# Altium PCB HCD_PCB.PcbDoc (part 3 of 4)
Units mil, origin at the board's own origin, x right, y up, seen from the top; angles counter-clockwise.
Board outline 2762.03 x 3428.03 mil, 2 copper layers (Top Layer, Bottom Layer), stack 57 mil thick; 112 components, 73 nets, 363 pads, 145 vias.
Unrouted connection lines stored in the file: 1.
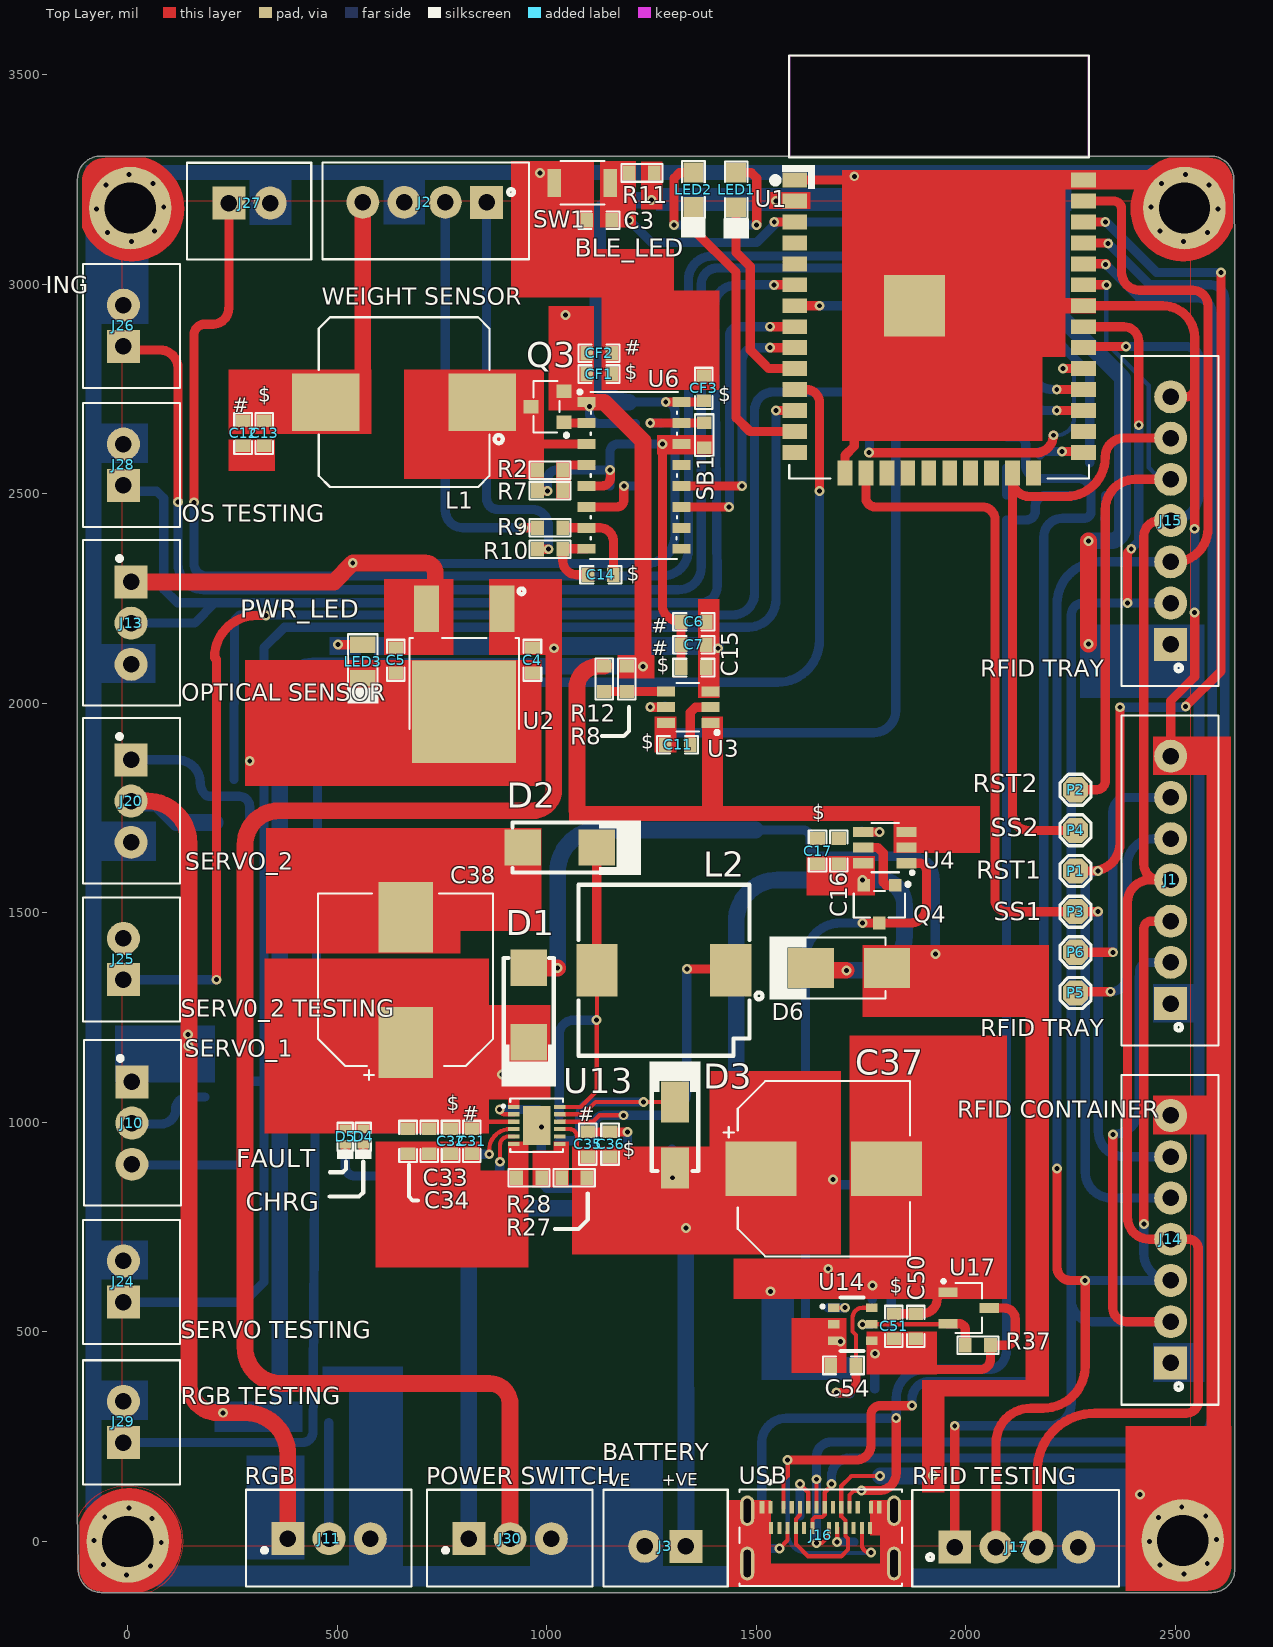
[diagram p0: Top Layer view]

## Part data (continued)
U13: "Battery Charger Li-Ion 2000mA 4.2V Automotive 12-Pin DFN EP", Case/Package=DFN, Manufacturer="Analog Devices / Linear Technology", Max Charge Current=2A, Max Operating Temperature=125°C, Max Output Voltage=4.2V, Max Supply Voltage=32V, Min Operating Temperature=-40°C, Min Supply Voltage=4.95V, Output Current=2mA, Package Quantity=121, Supplier Part Number 1=LT3652EDD#PBF-ND, Category="Battery Management", ComponentLink1Description=http://www.mouser.com/ds/2/445/7447779122-538892.pdf?src-supplier=Mouser, ComponentLink1URL=http://www.mouser.com/ds/2/445/7447779122-538892.pdf?src-supplier=Mouser, ComponentLink2Description=http://katalog.we-online.de/pbs/datasheet/7447779122.pdf?src-supplier=Digi-Key, ComponentLink2URL=http://katalog.we-online.de/pbs/datasheet/7447779122.pdf?src-supplier=Digi-Key, ComponentLink3Description=https://datasheet.ciiva.com/1138/1692510-1138257.pdf?src-supplier=Element14, ComponentLink3URL=https://datasheet.ciiva.com/1138/1692510-1138257.pdf?src-supplier=Element14, ComponentLink4Description=https://datasheet.ciiva.com/14093/lt3652-eng-ds-14093922.pdf?src-supplier=Distrelec, ComponentLink4URL=https://datasheet.ciiva.com/14093/lt3652-eng-ds-14093922.pdf?src-supplier=Distrelec, ComponentLink5Description=https://datasheet.ciiva.com/15114/getdatasheetpartid-368876-15114676.pdf?src-supplier=Verical, ComponentLink5URL=https://datasheet.ciiva.com/15114/getdatasheetpartid-368876-15114676.pdf?src-supplier=Verical, ComponentLink6Description=https://datasheet.ciiva.com/30477/0900766b812525a8-30477820.pdf?src-supplier=RSComponents, ComponentLink6URL=https://datasheet.ciiva.com/30477/0900766b812525a8-30477820.pdf?src-supplier=RSComponents, ComponentLink7Description=https://datasheet.ciiva.com/1144/3652fd-1144158.pdf?src-supplier=Newark, ComponentLink7URL=https://datasheet.ciiva.com/1144/3652fd-1144158.pdf?src-supplier=Newark, ComponentLink8Description=https://datasheet.ciiva.com/26874/lt3652edd-pbf-26874578.pdf?src-supplier=IIIC, ComponentLink8URL=https://datasheet.ciiva.com/26874/lt3652edd-pbf-26874578.pdf?src-supplier=IIIC, ComponentLink9Description=https://datasheet.ciiva.com/1496/1692510-1496793.pdf?src-supplier=Farnell, ComponentLink9URL=https://datasheet.ciiva.com/1496/1692510-1496793.pdf?src-supplier=Farnell, ComponentLink10Description=https://datasheet.ciiva.com/22642/1684150-22642988.pdf?src-supplier=Element14, ComponentLink10URL=https://datasheet.ciiva.com/22642/1684150-22642988.pdf?src-supplier=Element14, ComponentLink11Description=https://datasheet.ciiva.com/22647/1692510-22647788.pdf?src-supplier=Farnell, ComponentLink11URL=https://datasheet.ciiva.com/22647/1692510-22647788.pdf?src-supplier=Farnell, ComponentLink12Description=https://datasheet.ciiva.com/1932/28522-1932094.pdf?src-supplier=Digi-Key, ComponentLink12URL=https://datasheet.ciiva.com/1932/28522-1932094.pdf?src-supplier=Digi-Key, Height=0.7mm, Length=3mm, Manufacturer Part Number=LT3652EDD#PBF, Max Output Current=2A, Mount="Surface Mount", Number of Pins=12, Output Voltage=4.2V, Packaging=Rail/Tube, Pricing 1="1=7.32000, 10=6.60900, 25=6.30160, 100=5.47170, 250=5.22580, 500=4.76470, 1000=4.35000 (USD)", Radiation Hardening=No, REACH SVHC="No SVHC", RoHS=Yes, RoHS Compliant=Yes, Series=-, Stock 1=1554, Supplier 1=Digi-Key, Width=3mm
U14: "IC PWR SWITCH P-CHAN 1:1 6TSOP", Case/Package=TSOP, Current Rating=2.8A, Manufacturer=Vishay, Max Operating Temperature=150°C, Max Power Dissipation=830mW, Max Supply Voltage=12V, Min Operating Temperature=-55°C, Min Supply Voltage=1.5V, On-State Resistance=165mR, On-state Resistance-Max=54mR, Output Current=1A, Package Quantity=3000, Supplier Part Number 1=SI3865DDV-T1-GE3CT-ND, ComponentLink1Description=http://www.mouser.com/ds/2/427/si3865ddv-256526.pdf?src-supplier=Mouser, ComponentLink1URL=http://www.mouser.com/ds/2/427/si3865ddv-256526.pdf?src-supplier=Mouser, ComponentLink2Description=http://www.vishay.com/docs/67998/si3865ddv.pdf?src-supplier=Avnet, ComponentLink2URL=http://www.vishay.com/docs/67998/si3865ddv.pdf?src-supplier=Avnet, ComponentLink3Description=https://www.verical.com/server-webapp/html/getDatasheet?partID=710254&src-supplier=Verical, ComponentLink3URL=https://www.verical.com/server-webapp/html/getDatasheet?partID=710254&src-supplier=Verical, ComponentLink4Description=https://media.digikey.com/pdf/Data%20Sheets/Vishay%20Siliconix%20PDFs/Si3865DDV.pdf?src-supplier=Digi-Key, ComponentLink4URL=https://media.digikey.com/pdf/Data%20Sheets/Vishay%20Siliconix%20PDFs/Si3865DDV.pdf?src-supplier=Digi-Key, Height=1mm, Interface=On/Off, Lead Free="Lead Free", Length=3.1mm, Manufacturer Part Number=SI3865DDV-T1-GE3, Max Output Current=2.8A, Mount="Surface Mount", Number of Outputs=1, Number of Pins=6, Output Configuration="High Side", Packaging="Tape and Reel", Power Dissipation=830mW, Pricing 1="1=0.58, 10=0.494, 25=0.462, 100=0.3432, 500=0.26796, 1000=0.2178 (USD)", Radiation Hardening=No, Rated Current-Max=2.8A, REACH SVHC="No SVHC", RoHS Compliant=Yes, Series=TrenchFET®, Stock 1=54870, Supplier 1=Digi-Key, Weight=0.000705oz, Width=1.7mm
U17: "IC SUPERVISOR 1 CHANNEL 3SSOP", Case/Package=TO-236-3, Manufacturer=Rohm, Max Operating Temperature=105°C, Max Supply Voltage=6V, Min Operating Temperature=-40°C, Min Supply Voltage=2.3V, Number of Voltages Monitored=1, Operating Supply Current=900nA, Package Quantity=3000, Supplier Part Number 1=BD48K50G-TLCT-ND, Threshold Voltage=5V, Accuracy=1%, Category="Voltage Supervisors", ComponentLink1Description=https://datasheet.ciiva.com/15105/getdatasheetpartid-705737-15105785.pdf?src-supplier=Verical, ComponentLink1URL=https://datasheet.ciiva.com/15105/getdatasheetpartid-705737-15105785.pdf?src-supplier=Verical, ComponentLink2Description=https://datasheet.ciiva.com/6602/bd48xxg-e-6602101.pdf?src-supplier=Digi-Key, ComponentLink2URL=https://datasheet.ciiva.com/6602/bd48xxg-e-6602101.pdf?src-supplier=Digi-Key, Lead Free="Lead Free", Manufacturer Part Number=BD48K50G-TL, Mount="Surface Mount", Number of Monitored Inputs=1, Number of Pins=3, Packaging="Tape and Reel", Pricing 1="1=0.48000, 10=0.39000, 25=0.35680, 100=0.26560, 250=0.24068, 500=0.19920, 1000=0.14940 (USD)", Reset="Active Low", RoHS=Yes, RoHS Compliant=Yes, Series=BD48xxx, Stock 1=3673, Supplier 1=Digi-Key, Type="Simple Reset/Power-On Reset"

## Free pads (board coordinates)
  round 196.85 hole 122.05: MH1(6,3182) MH2(2522,3182) MH3(2518,2.51) MH4(0,0)

## Via types
v1: diameter 23.62, hole 11.81, Top Layer to Bottom Layer, tented both sides, 100 vias
v2: diameter 23.62, hole 11.81, Top Layer to Bottom Layer, 45 vias

## Nets (pads, with @x,y where several pads share a name; then routed paths per layer and width w, separated by ;. In a path a pad name is that pad's centre, name@x,y a point inside that pad or via, vN(x,y) a via of type N, cw(c..) or ccw(c..) an arc to the next point about the centre after c; other vN are vias at no path point)
#BASE: Q3.1 U6.2 | length 59.8
  Top Layer w22: Q3.1@1035,2669 U6.2@1094.81,2669
#INNA: C14.1 R9.2 U6.7 | length 219.1
  Top Layer w22: R9.2@1038.12,2419 U6.7@1094.81,2419 1127,2419 cw(c1127,2387) 1159,2387 C14.1@1159,2307
#INPA: C14.2 R10.2 U6.8 | length 164.6
  Top Layer w22: U6.8@1094.81,2369 1039.12,2369 ccw(c1039.12,2368) 1038.12,2368 1038.12,2340.88 ccw(c1072,2340.88) 1072,2307 C14.2@1099,2307
#RGB: J11.2 U8.4 | length 278.7
  Bottom Layer w22: J11.2@479.57,4.53 U8.4@479.57,283.24
#SERVO: J10.2 U7.4 | length 211.2
  Bottom Layer w22: J10.2@10,998.57 12.03,996.54 80.1,996.54 ccw(c80.1,1030.94) 80.17,996.54 ccw(c80.1,1030.94) 114.5,1030.94 114.5,1031 cw(c144.1,1031) 144.1,1060.6 U7.4@183.82,1060.6
#SERVO_2: J20.1 U19.4 | length 380.7
  Bottom Layer w22: J20.1@14,1865.43 118.09,1865.43 cw(c118.09,1810.31) 173.2,1810.31 ccw(c212.23,1810.31) 184.64,1782.71 ccw(c195.58,1793.66) 195.58,1778.18 266.2,1778.18 cw(c266.2,1753.18) 291.2,1753.18 U19.4@291.2,1715.82
#SW: C11.1 U3.2 | length 131.2
  Top Layer w22: C11.1@1342.38,1901 1342.38,1978.11 1355.14,1990.88 1391.02,1990.88 U3.2@1391.15,1991
"#V FB": R2.2 R7.2 U6.4 | length 61.1
  Top Layer w22: R7.2@1037,2509 ccw(c1038,2509) R7.2@1038,2508 ; R2.2@1037,2566 cw(c1040,2566) 1040,2569 U6.4@1094.81,2569
ACTUATOR1_SIG.AMP_OUT: U1.9 U6.12 | length 587.9
  Top Layer w22: U6.12@1321.19,2519 v2(1466.19,2519) ; v2(1533.05,2849) U1.9@1592.02,2849
  Bottom Layer w22: v2(1466.19,2519) 1466.19,2818.79 cw(c1496.4,2818.79) 1496.4,2849 v2(1533.05,2849)
ACTUATOR1_SIG.PD_SCK: U1.8 U6.11 | length 689.9
  Top Layer w22: U6.11@1321.19,2469 v2(1435,2469) ; v2(1533.05,2899) U1.8@1592.02,2899
  Bottom Layer w22: v2@1436,2469.49 1436,2877.02 cw(c1458,2877.02) 1456.97,2899 ; 1456.98,2899 v2(1533.05,2899)
ACTUATOR2_SIG.OP_SNS: J13.2 J28.1 U1.6 | length 2764
  Top Layer w22: v1(1542,2999) U1.6@1592.02,2999
  Bottom Layer w22: J28.1@7.02,2506.58 68.95,2506.58 86,2489.53 86,2272.61 118.61,2240 208,2240 ; J13.2@13,2191.57 159.57,2191.57 208,2240 ; v1(1542,2999) 1451.33,2999 1450.33,2998 ccw(c1450.33,2948.03) 1400.36,2948.09 1407,2289.39 1407,2280 cw(c1367,2280) 1367,2240 208,2240
ACTUATOR2_SIG.Rx2: J26.1 U1.27 | length 3793.4
  Top Layer w22: J26.1@0.02,2843.58 76.94,2843.58 cw(c76.94,2800.54) 119.97,2800.54 v1(119.97,2481) ; v2(2217.19,2699) 2218,2699 U1.27@2281,2699
  Bottom Layer w22: v1(119.97,2481) 119.97,2333.03 ccw(c182,2333.03) 182,2271 1314,2271 ccw(c1314,2326) 1369,2326 1369,3001 cw(c1407,3001) 1407,3039 2016,3039 cw(c2016,2939) 2116,2939 2116,2773.7 ccw(c2190.7,2773.7) 2190.7,2699 v2@2209,2699